# Altium PCB Sampler.PCBDOC (part 6 of 11)
Units mm, origin at the board's own origin, x right, y up, seen from the top; angles counter-clockwise.
Board outline 222.9 x 100 mm, 4 copper layers (L1, P2, L3, L4), stack 1.6 mm thick; 754 components, 442 nets, 2347 pads, 1230 vias.
Unrouted connection lines stored in the file: 10.
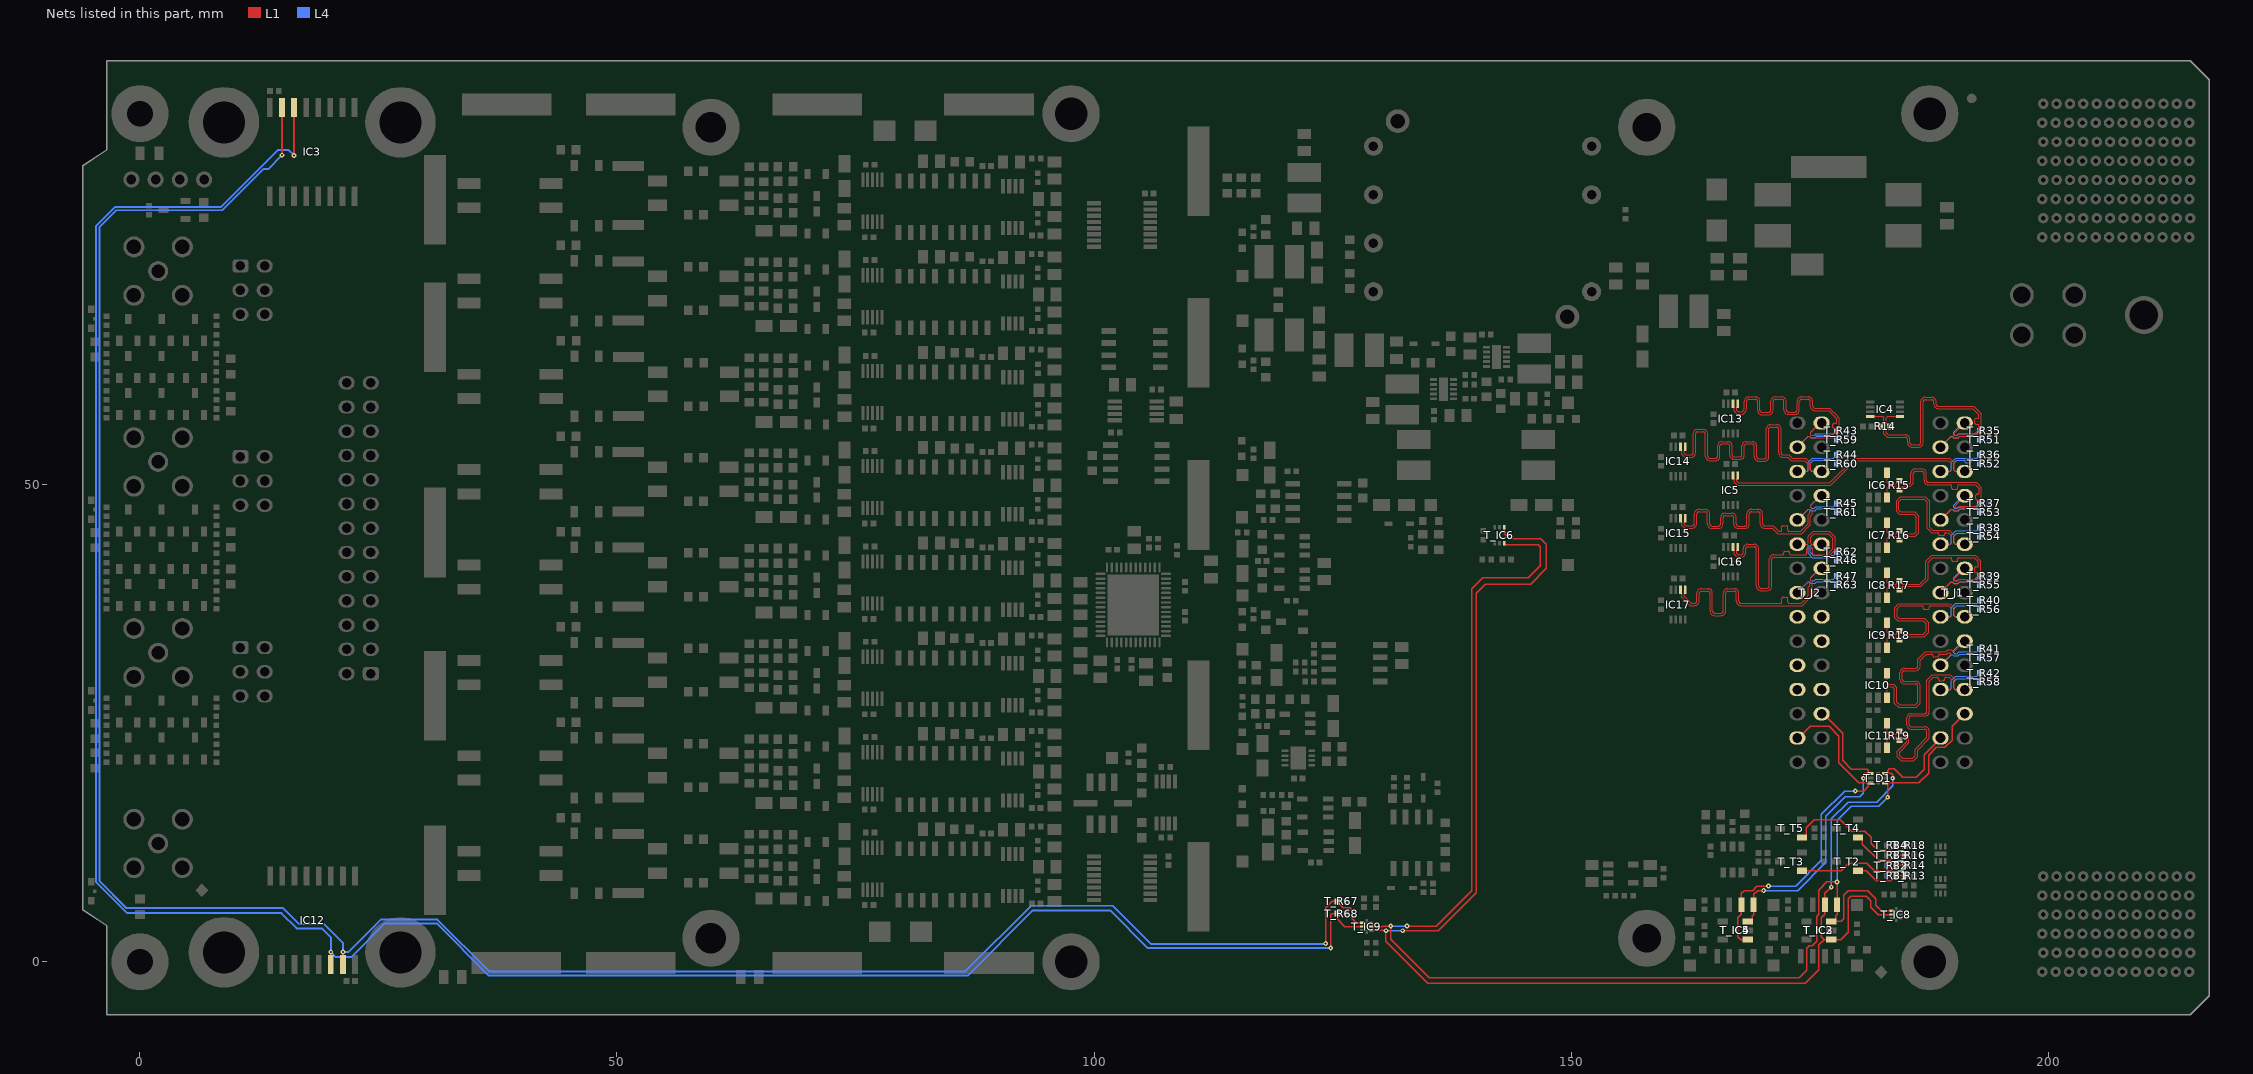
[diagram p7: the nets of this part, all layers, seen from the top]

## Via types
v1: diameter 0.5, hole 0.2, L1 to L4, tented both sides, 1208 vias
v2: diameter 1, hole 0.6, L1 to L4, tented both sides, 16 vias
v3: diameter 0.6, hole 0.3, L1 to L4, tented both sides, 6 vias

## Nets (pads, with @x,y where several pads share a name; then routed paths per layer and width w, separated by ;. In a path a pad name is that pad's centre, name@x,y a point inside that pad or via, vN(x,y) a via of type N, cw(c..) or ccw(c..) an arc to the next point about the centre after c; other vN are vias at no path point) (continued)
EEM0_I2C.SCL: T_D1.3 T_IC2.1 T_IC3.6 T_IC6.1 T_IC8.3 T_IC9.6 T_J1.27 | length 157
  L1 w0.152: T_IC9.6@129.075,3.3 130.563,3.3 v1(130.6,3.263) 130.6,2.17 134.995,-2.225 174.575,-2.225 175.975,-0.825 175.975,1.781 176.528,2.334 ; v1(132.352,3.263) 136.063,3.263 140.058,7.258 140.058,38.648 141.01,39.6 145.769,39.6 147.429,41.259 147.429,43.766 146.827,44.367 143.483,44.367 143,44.85 T_IC6.1@143,45.538 ; v1(177.275,7.825) 177.271,7.825 176.618,7.172 T_IC3.6@176.618,5.984 176.618,4.964 176.255,4.601 176.255,2.608 176.528,2.334 ; T_D1.3@182.937,19.75 T_D1.3@183.175,19.75 ; T_IC8.3@183.616,4.958 182.21,4.958 181.425,5.743 181.425,6.425 180.961,6.889 179.314,6.889 179.042,6.617 179.042,3.095 178.281,2.334 T_IC2.1@177.283,2.334 176.528,2.334 ; v1(183.714,19.243) 183.714,19.625 183.589,19.75 T_D1.3@183.175,19.75 ; T_J1.27@188.73,23.46 187,21.73 187,20.175 186.175,19.35 184.775,19.35 183.9,20.225 183.375,20.225 183.175,20.025 T_D1.3@183.175,19.75
  L4 w0.152: v1(130.6,3.263) v1(132.352,3.263) ; v1(177.275,7.825) 177.275,14.972 179.055,16.751 182.026,16.751 183.714,18.439 v1(183.714,19.243)
EEM0_I2C.SDA: T_D1.1 T_IC2.3 T_IC3.5 T_IC6.6 T_IC8.2 T_IC9.7 T_J1.26 | length 158.5
  L1 w0.152: T_IC9.7@129.075,3.7 130.225,3.7 130.276,3.75 v1(131.1,3.75) 131.1,2.378 135.153,-1.675 173.9,-1.675 174.71,-0.865 174.71,1.435 174.969,1.694 175.27,1.694 175.75,2.174 175.75,4.75 175.975,4.975 175.975,7.525 176.818,8.368 v1(177.888,8.368) T_IC3.5@177.888,5.984 177.888,4.937 177.757,4.806 177.757,4.458 T_IC2.3@177.533,4.234 ; v1(132.8,3.75) 135.867,3.75 139.575,7.458 139.575,39.084 140.74,40.25 145.5,40.25 146.779,41.529 146.779,43.496 146.558,43.717 143.074,43.717 143,43.791 T_IC6.6@143,43.862 ; T_IC2.3@177.283,4.234 T_IC2.3@177.533,4.234 ; T_D1.1@182.937,18.75 T_D1.1@183.102,18.75 ; v1(183.188,17.25) 183.188,18.663 T_D1.1@183.102,18.75 ; T_IC8.2@183.616,5.358 182.517,5.358 181.925,5.95 181.925,6.632 181.097,7.461 179.081,7.461 178.6,6.979 178.6,4.523 178.311,4.234 T_IC2.3@177.533,4.234 ; T_J1.26@191.27,26 189.94,24.67 189.94,23.215 189.2,22.475 188.288,22.475 187.475,21.662 187.475,19.756 186.469,18.75 T_D1.1@183.102,18.75
  L4 w0.152: v1(131.1,3.75) v1(132.8,3.75) ; v1(177.888,8.368) 177.888,14.838 179.35,16.3 182.238,16.3 v1(183.188,17.25)
EEM0_INT_I2C.SCL: IC3.14 IC12.14 T_IC9.3 T_R68.1 | length 248.9
  L1 w0.152: IC12.14@20.005,-0.3 v1@20.005,1.031 ; v1(124.815,1.441) 124.815,4.972 124.904,5.061 T_R68.1@125.48,5.061 125.48,4.525 126.305,3.7 T_IC9.3@128.125,3.7
  L1 w0.203: v1@16.125,84.5 v1(16.145,84.52) IC3.14@16.145,89.55
  L4 w0.203: v1(16.145,84.52) 15.578,85.087 14.438,85.087 8.463,79.112 -2.621,79.112 -4.594,77.139 -4.594,18.575 -4.594,8.342 -1.351,5.099 14.822,5.099 16.413,3.508 19.047,3.508 20.005,2.55 v1(20.005,1.038) 20.543,0.5 22.141,0.5 25.678,4.036 31.088,4.036 36.564,-1.44 86.745,-1.44 93.572,5.387 101.706,5.387 105.652,1.441 v1(124.815,1.441)
EEM0_INT_I2C.SDA: IC3.15 IC12.15 T_IC9.2 T_R67.1 | length 246.8
  L1 w0.152: IC12.15@21.275,-0.3 v1@21.275,1.031 ; v1(124.285,1.919) 124.285,5.66 124.956,6.331 T_R67.1@125.48,6.331 125.48,6.311 126.116,5.675 126.8,5.675 127.025,5.45 127.025,4.573 127.498,4.1 T_IC9.2@128.125,4.1
  L1 w0.203: v1(14.875,84.55) IC3.15@14.875,89.55
  L4 w0.203: v1(14.875,84.55) 13.425,83.1 12.92,83.1 8.6,78.78 -2.484,78.78 -4.263,77.002 -4.263,18.575 -4.263,8.479 -1.413,5.629 15.013,5.629 16.701,3.941 19.32,3.941 21.275,1.985 v1(21.275,1.038) 21.876,1.038 25.257,4.419 31.174,4.419 36.602,-1.009 86.52,-1.009 93.407,5.879 101.963,5.879 105.953,1.888 124.254,1.888 v1(124.285,1.919)
EEM1_I2C.SCL: T_D1.6 T_IC4.1 T_IC5.6 T_J2.27 | length 39.3
  L1 w0.152: T_IC4.1@168.528,2.334 167.773,2.334 167.499,2.608 167.499,4.601 167.863,4.964 T_IC5.6@167.863,5.984 167.863,7.172 168.165,7.475 169.025,7.475 169.493,7.943 v1(170.691,7.943) ; T_J2.27@173.73,23.46 173.88,23.46 175.095,24.675 177.051,24.675 178.057,23.669 178.057,20.872 180.179,18.75 T_D1.6@181.252,18.75 ; v1(179.79,17.9) 180.675,17.9 181.165,18.39 181.165,18.663 T_D1.6@181.252,18.75 ; T_D1.6@181.417,18.75 T_D1.6@181.252,18.75
  L4 w0.152: v1(170.691,7.943) 173.543,7.943 176.223,10.623 176.223,15.442 178.681,17.9 v1(179.79,17.9)
EEM1_I2C.SDA: T_D1.4 T_IC4.3 T_IC5.5 T_J2.26 | length 34.1
  L1 w0.152: T_IC4.3@168.528,4.234 168.778,4.234 169.001,4.458 169.001,4.806 169.133,4.937 T_IC5.5@169.133,5.984 169.133,7.058 169.547,7.472 v1(170.195,7.472) ; T_J2.26@176.27,26 176.42,26 178.475,23.945 178.475,21.124 179.399,20.2 181.05,20.2 181.178,20.072 T_D1.4@181.178,19.75 ; v1(180.639,19.243) 180.639,19.625 180.764,19.75 T_D1.4@181.178,19.75 ; T_D1.4@181.417,19.75 T_D1.4@181.178,19.75
  L4 w0.152: v1(170.195,7.472) 173.747,7.472 176.7,10.425 176.7,15.244 178.756,17.3 180.275,17.3 180.639,17.664 v1(180.639,19.243)
EEM_IO.LVDS_N0: IC4.1 R14.1 T_J1.3 T_R51.2 | length 31.5
  L1 w0.127: R14.1@183.387,56.114 183.044,55.771 183.044,55.438 183.251,55.231 183.476,55.231 185.048,55.231 cw(c185.048,54.752) 185.527,54.752 185.527,54.423 ccw(c185.753,54.423) 185.753,54.198 186.429,54.198 ccw(c186.429,54.423) 186.654,54.423 186.654,58.696 cw(c187.134,58.696) 187.134,59.176 187.81,59.176 cw(c187.81,58.696) 188.289,58.696 188.289,58.458 ccw(c188.515,58.458) 188.515,58.233 188.966,58.233 189.104,58.233 192.221,58.233 193.012,57.442 193.012,55.726 192.376,55.09 192.279,55.09 192.276,55.087 190.746,55.087 190.528,54.869 190.128,54.869 189.978,55.019 189.809,55.019 T_J1.3@188.73,53.94 ; R14.1@183.387,56.134 183.161,56.36 183.119,56.36 183.044,56.435 183.044,57.026 183.183,57.164 IC4.1@184.467,57.164
  L4 w0.127: T_J1.3@188.73,53.94 189.858,55.068 189.963,55.068 190.112,54.919 190.6,54.919 190.771,55.09 192.535,55.09 192.856,54.769 T_R51.2@192.856,54.749
EEM_IO.LVDS_N1: IC5.5 T_J1.6 T_R52.2 | length 32
  L1 w0.127: IC5.5@167.478,50.994 167.478,50.719 167.355,50.596 167.355,50.384 167.52,50.219 177.138,50.219 179.721,52.801 189.699,52.801 190.152,52.347 190.152,51.52 190.272,51.4 T_J1.6@191.27,51.4
  L4 w0.127: T_J1.6@191.27,51.4 190.287,51.4 190.102,51.586 190.102,52.242 190.41,52.55 190.498,52.55 191.189,52.55 cw(c191.189,52.423) 191.316,52.423 191.316,52.416 ccw(c191.441,52.416) 191.441,52.291 191.817,52.291 ccw(c191.817,52.416) 191.943,52.416 191.943,52.423 cw(c192.07,52.423) 192.07,52.55 192.535,52.55 192.566,52.519 192.856,52.229 T_R52.2@192.856,52.209
EEM_IO.LVDS_N2: IC6.4 R15.1 T_J1.9 T_R53.2 | length 25.4
  L1 w0.127: IC6.4@183.127,51.27 183.127,50.274 183.303,50.098 184.065,50.098 184.407,50.44 R15.1@184.427,50.44 184.447,50.44 184.788,50.098 185.207,50.098 185.398,50.098 ccw(c185.398,50.323) 185.623,50.323 185.623,51.178 cw(c186.102,51.178) 186.102,51.657 186.779,51.657 cw(c186.779,51.178) 187.258,51.178 187.258,50.468 ccw(c187.483,50.468) 187.483,50.243 188.085,50.243 192.486,50.243 193.025,49.705 193.025,49.49 193.025,47.992 192.53,47.497 192.428,47.497 192.427,47.496 190.849,47.496 190.632,47.279 190.223,47.279 190.073,47.429 189.904,47.429 T_J1.9@188.825,46.35
  L4 w0.127: T_J1.9@188.73,46.32 189.858,47.448 189.963,47.448 190.112,47.299 190.6,47.299 190.771,47.47 192.535,47.47 192.856,47.149 T_R53.2@192.856,47.129
EEM_IO.LVDS_N3: IC7.4 R16.1 T_J1.12 T_R54.2 | length 25.9
  L1 w0.127: IC7.4@183.127,46.02 183.127,45.024 183.303,44.848 184.065,44.848 184.407,45.19 R16.1@184.427,45.19 184.447,45.19 184.788,44.848 185.954,44.848 186.2,45.094 186.2,46.599 185.903,46.896 184.445,46.896 184.37,46.97 184.121,47.22 184.121,48.33 184.52,48.729 187.155,48.729 187.23,48.655 187.589,48.295 187.589,45.543 187.885,45.247 189.633,45.247 189.713,45.167 190.152,44.727 190.152,43.9 190.272,43.78 T_J1.12@191.27,43.78
  L4 w0.127: T_J1.12@191.27,43.78 190.287,43.78 190.102,43.966 190.102,44.622 190.41,44.93 192.535,44.93 192.856,44.609 T_R54.2@192.856,44.589
EEM_IO.LVDS_N4: IC8.4 R17.1 T_J1.15 T_R55.2 | length 25.3
  L1 w0.127: IC8.4@183.127,40.77 183.127,39.774 183.303,39.598 184.065,39.598 184.407,39.94 R17.1@184.427,39.94 184.447,39.94 184.788,39.598 186.543,39.598 187.173,40.228 187.173,41.978 187.805,42.609 192.359,42.609 192.962,42.006 192.962,40.382 192.416,39.836 190.744,39.836 190.537,39.629 190.128,39.629 189.978,39.779 189.809,39.779 T_J1.15@188.73,38.7
  L4 w0.127: T_J1.15@188.73,38.7 189.858,39.828 189.963,39.828 190.112,39.679 190.6,39.679 190.771,39.85 192.535,39.85 192.856,39.529 T_R55.2@192.856,39.509
EEM_IO.LVDS_N5: IC9.4 R18.1 T_J1.18 T_R56.2 | length 24.5
  L1 w0.127: IC9.4@183.127,35.52 183.127,34.524 183.303,34.348 184.065,34.348 184.407,34.69 184.447,34.69 184.788,34.348 186.916,34.348 187.225,34.657 187.225,35.458 186.937,35.746 184.231,35.746 183.92,36.056 183.92,37.134 184.069,37.283 184.193,37.407 184.342,37.555 186.115,37.555 189.704,37.555 189.801,37.459 190.152,37.107 190.152,36.28 190.272,36.16 T_J1.18@191.27,36.16
  L4 w0.127: T_J1.18@191.27,36.16 190.287,36.16 190.102,36.346 190.102,37.002 190.41,37.31 192.535,37.31 192.856,36.989 T_R56.2@192.856,36.969
EEM_IO.LVDS_N6: IC10.3 T_J1.21 T_R57.2 | length 24.6
  L1 w0.127: IC10.3@183.127,27.67 183.127,28.617 183.325,28.816 183.7,28.816 183.9,28.616 183.9,27.12 184.34,26.68 186.165,26.68 186.605,27.119 186.605,28.725 186.605,28.916 ccw(c186.125,28.916) 186.125,29.395 184.952,29.395 cw(c184.952,29.62) 184.727,29.62 184.727,30.297 cw(c184.952,30.297) 184.952,30.522 186.125,30.522 ccw(c186.125,31.001) 186.605,31.001 186.605,31.591 186.605,31.606 187.149,32.151 187.255,32.256 187.776,32.256 cw(c187.776,32.129) 187.903,32.129 187.903,32.096 ccw(c188.028,32.096) 188.028,31.971 188.404,31.971 ccw(c188.404,32.096) 188.53,32.096 188.53,32.129 cw(c188.657,32.129) 188.657,32.256 189.02,32.256 189.387,32.256 189.522,32.391 189.708,32.391 189.822,32.277 189.822,32.172 T_J1.21@188.73,31.08
  L4 w0.127: T_J1.21@188.73,31.08 189.858,32.208 189.963,32.208 190.112,32.059 190.6,32.059 190.771,32.23 192.535,32.23 192.856,31.909 T_R57.2@192.856,31.889
EEM_IO.LVDS_N7: IC11.4 R19.1 T_J1.24 T_R58.2 | length 30.4
  L1 w0.127: IC11.4@183.127,25.02 183.127,24.024 183.303,23.848 184.065,23.848 184.407,24.19 R19.1@184.427,24.19 184.447,24.19 184.79,23.847 185.143,23.847 185.424,23.566 185.424,22.958 184.45,21.984 184.45,21.583 184.708,21.325 185.821,21.325 186.096,21.6 186.096,22.302 186.245,22.45 187.31,23.516 187.31,23.973 187.31,24.163 ccw(c187.085,24.163) 187.085,24.389 185.661,24.389 cw(c185.661,24.868) 185.181,24.868 185.181,25.544 cw(c185.661,25.544) 185.661,26.024 187.085,26.024 ccw(c187.085,26.249) 187.31,26.249 187.31,26.8 187.31,29.5 187.459,29.649 187.729,29.919 187.878,30.068 189.74,30.068 189.889,29.919 190.004,29.804 190.152,29.655 190.152,28.66 190.272,28.54 T_J1.24@191.27,28.54
  L4 w0.127: T_J1.24@191.27,28.54 190.287,28.54 190.102,28.726 190.102,29.382 190.41,29.69 192.535,29.69 192.856,29.369 T_R58.2@192.856,29.349
EEM_IO.LVDS_N8: IC13.5 T_J2.3 T_R59.2 | length 30.8
  L1 w0.127: IC13.5@167.478,58.494 167.478,58.219 167.355,58.096 167.355,57.829 167.547,57.637 167.929,57.637 168.029,57.737 ; 168.029,57.737 ccw(c167.694,58.073) 168.169,58.073 168.169,58.735 cw(c168.648,58.735) 168.648,59.215 169.324,59.215 cw(c169.324,58.735) 169.804,58.735 169.804,57.821 ccw(c170.029,57.821) 170.029,57.595 170.705,57.595 ccw(c170.705,57.821) 170.931,57.821 170.931,58.735 cw(c171.41,58.735) 171.41,59.215 172.086,59.215 cw(c172.086,58.735) 172.566,58.735 172.566,57.85 ccw(c172.791,57.85) 172.791,57.624 173.467,57.624 ccw(c173.467,57.85) 173.693,57.85 173.693,58.735 cw(c174.172,58.735) 174.172,59.215 174.848,59.215 cw(c174.848,58.735) 175.328,58.735 175.328,58.264 ccw(c175.553,58.264) 175.553,58.039 176.152,58.039 177.102,58.039 177.251,57.89 177.742,57.398 178.035,57.105 178.11,57.031 178.11,55.564 177.961,55.415 177.613,55.067 177.464,54.919 175.111,54.919 174.963,55.067 174.857,55.067 T_J2.3@173.73,53.94
  L4 w0.127: T_J2.3@173.73,53.94 174.857,55.067 174.963,55.067 175.111,54.919 175.599,54.919 175.771,55.09 177.534,55.09 177.856,54.769 T_R59.2@177.856,54.749
EEM_IO.LVDS_N9: IC14.5 T_J2.6 T_R60.2 | length 38.2
  L1 w0.127: IC14.5@161.978,53.994 161.978,53.719 161.855,53.596 161.855,53.329 162.047,53.137 162.401,53.137 162.591,53.137 ccw(c162.591,53.342) 162.797,53.342 162.797,55.34 cw(c163.256,55.34) 163.256,55.8 163.872,55.8 cw(c163.872,55.34) 164.332,55.34 164.332,52.994 ccw(c164.537,52.994) 164.537,52.789 165.153,52.789 ccw(c165.153,52.994) 165.359,52.994 165.359,54.074 cw(c165.818,54.074) 165.818,54.533 166.434,54.533 cw(c166.434,54.074) 166.894,54.074 166.894,53.129 ccw(c167.099,53.129) 167.099,52.924 167.715,52.924 ccw(c167.715,53.129) 167.921,53.129 167.921,54.074 cw(c168.38,54.074) 168.38,54.533 168.996,54.533 cw(c168.996,54.074) 169.456,54.074 169.456,52.943 ccw(c169.661,52.943) 169.661,52.737 170.277,52.737 ccw(c170.277,52.943) 170.483,52.943 170.483,55.85 cw(c170.942,55.85) 170.942,56.31 171.558,56.31 cw(c171.558,55.85) 172.018,55.85 172.018,53.342 ccw(c172.223,53.342) 172.223,53.137 172.823,53.137 173.19,52.769 173.548,52.769 174.628,52.769 175.127,52.27 175.127,51.474 175.201,51.4 T_J2.6@176.27,51.4
  L4 w0.127: T_J2.6@176.27,51.4 175.287,51.4 175.101,51.585 175.101,52.242 175.41,52.55 177.534,52.55 177.856,52.229 T_R60.2@177.856,52.209
EEM_IO.LVDS_N10: IC15.5 T_J2.9 T_R61.2 | length 31.2
  L1 w0.127: IC15.5@161.977,46.494 161.977,46.219 161.854,46.096 161.854,45.873 162.016,45.711 162.5,45.711 162.691,45.711 ccw(c162.691,45.936) 162.916,45.936 162.916,46.938 cw(c163.395,46.938) 163.395,47.418 164.072,47.418 cw(c164.072,46.938) 164.551,46.938 164.551,45.901 ccw(c164.776,45.901) 164.776,45.676 165.453,45.676 ccw(c165.453,45.901) 165.678,45.901 165.678,46.554 cw(c166.157,46.554) 166.157,47.034 166.834,47.034 cw(c166.834,46.554) 167.313,46.554 167.313,45.901 ccw(c167.538,45.901) 167.538,45.676 168.215,45.676 ccw(c168.215,45.901) 168.44,45.901 168.44,46.938 cw(c168.919,46.938) 168.919,47.418 169.596,47.418 cw(c169.596,46.938) 170.075,46.938 170.075,45.936 ccw(c170.3,45.936) 170.3,45.711 171.02,45.711 171.181,45.711 171.749,45.143 171.901,45.143 171.964,45.143 ccw(c171.964,45.27) 172.091,45.27 172.091,45.59 cw(c172.216,45.59) 172.216,45.716 172.593,45.716 cw(c172.593,45.59) 172.718,45.59 172.718,45.27 ccw(c172.845,45.27) 172.845,45.143 173.378,45.143 174.066,45.143 174.845,45.922 174.845,46.835 175.037,47.027 175.037,47.373 174.963,47.447 174.857,47.447 T_J2.9@173.73,46.32
  L4 w0.127: T_J2.9@173.73,46.32 174.857,47.447 174.963,47.447 175.111,47.299 175.599,47.299 175.771,47.47 177.534,47.47 177.856,47.149 T_R61.2@177.856,47.129
EEM_IO.LVDS_N11: IC16.5 T_J2.12 T_R62.2 | length 31.7
  L1 w0.127: IC16.5@167.478,43.495 167.478,43.22 167.355,43.097 167.355,42.83 167.517,42.668 167.624,42.668 167.815,42.668 ccw(c167.815,42.893) 168.04,42.893 168.04,43.289 cw(c168.519,43.289) 168.519,43.768 169.196,43.768 cw(c169.196,43.289) 169.675,43.289 169.675,39.397 ccw(c169.9,39.397) 169.9,39.172 170.577,39.172 ccw(c170.577,39.397) 170.802,39.397 170.802,42.188 cw(c171.281,42.188) 171.281,42.668 171.897,42.668 172.088,42.668 172.151,42.668 ccw(c172.151,42.795) 172.278,42.795 172.278,42.891 cw(c172.404,42.891) 172.404,43.016 172.78,43.016 cw(c172.78,42.891) 172.905,42.891 172.905,42.795 ccw(c173.032,42.795) 173.032,42.668 173.344,42.668 174.503,42.668 174.567,42.668 ccw(c174.567,42.795) 174.694,42.795 174.694,43.258 cw(c174.819,43.258) 174.819,43.383 175.195,43.383 cw(c175.195,43.258) 175.321,43.258 175.321,42.795 ccw(c175.448,42.795) 175.448,42.668 175.971,42.668 176.854,42.668 177.459,43.272 177.459,44.377 176.95,44.886 175.485,44.886 175.127,44.528 175.127,43.854 175.201,43.78 T_J2.12@176.27,43.78
  L4 w0.127: T_J2.12@176.27,43.78 175.287,43.78 175.101,43.594 175.101,42.938 175.41,42.629 177.534,42.629 177.856,42.951 T_R62.2@177.856,42.971
EEM_IO.LVDS_N12: IC17.5 T_J2.15 T_R63.2 | length 30.5
  L1 w0.127: IC17.5@161.977,38.995 161.977,38.72 161.854,38.597 161.854,38.33 162.586,37.597 162.777,37.597 162.968,37.597 ccw(c162.968,37.823) 163.193,37.823 163.193,38.64 cw(c163.673,38.64) 163.673,39.12 164.349,39.12 cw(c164.349,38.64) 164.828,38.64 164.828,36.775 ccw(c165.054,36.775) 165.054,36.549 165.73,36.549 ccw(c165.73,36.775) 165.955,36.775 165.955,38.64 cw(c166.435,38.64) 166.435,39.12 167.111,39.12 cw(c167.111,38.64) 167.59,38.64 167.59,37.823 ccw(c167.816,37.823) 167.816,37.597 168.432,37.597 171.908,37.597 171.972,37.597 ccw(c171.972,37.724) 172.099,37.724 172.099,38.078 cw(c172.224,38.078) 172.224,38.203 172.6,38.203 cw(c172.6,38.078) 172.726,38.078 172.726,37.724 ccw(c172.853,37.724) 172.853,37.597 173.085,37.597 174.124,37.597 174.879,38.352 174.879,39.239 175.037,39.397 175.037,39.753 174.963,39.827 174.857,39.827 T_J2.15@173.73,38.7
  L4 w0.127: T_J2.15@173.73,38.7 174.857,39.827 174.963,39.827 175.111,39.679 175.599,39.679 175.771,39.85 177.534,39.85 177.856,39.529 T_R63.2@177.856,39.509
EEM_IO.LVDS_N13: T_J2.18
EEM_IO.LVDS_N14: T_J2.21
EEM_IO.LVDS_N15: T_J2.24
EEM_IO.LVDS_P0: IC4.8 R14.2 T_J1.2 T_R35.2 | length 31.4
  L1 w0.127: IC4.8@181.367,57.164 182.657,57.164 182.79,57.03 182.79,56.435 182.716,56.36 182.674,56.36 R14.2@182.447,56.134 ; R14.2@182.447,56.114 182.79,55.771 182.79,55.332 183.146,54.977 183.476,54.977 185.048,54.977 cw(c185.048,54.752) 185.273,54.752 185.273,54.423 ccw(c185.753,54.423) 185.753,53.944 186.429,53.944 ccw(c186.429,54.423) 186.908,54.423 186.908,58.696 cw(c187.134,58.696) 187.134,58.922 187.81,58.922 cw(c187.81,58.696) 188.035,58.696 188.035,58.458 ccw(c188.515,58.458) 188.515,57.979 188.966,57.979 189.104,57.979 192.115,57.979 192.443,57.65 192.758,57.336 192.758,57.054 192.664,56.96 192.412,56.96 192.318,56.866 192.318,56.427 192.412,56.333 192.664,56.333 192.758,56.239 192.758,55.831 192.458,55.532 192.271,55.344 190.628,55.344 190.453,55.169 190.292,55.169 190.178,55.283 190.178,55.388 T_J1.2@191.27,56.48
  L4 w0.127: T_J1.2@191.27,56.48 191.12,56.48 190.142,55.502 190.142,55.247 190.217,55.173 190.495,55.173 190.666,55.344 192.532,55.344 192.61,55.422 192.63,55.422 192.856,55.648 T_R35.2@192.856,55.668
EEM_IO.LVDS_P1: IC5.6 T_J1.5 T_R36.2 | length 32.1
  L1 w0.127: IC5.6@166.978,50.994 166.978,50.719 167.101,50.596 167.101,50.279 167.415,49.965 177.244,49.965 179.815,52.536 189.605,52.536 189.898,52.242 189.898,51.586 189.713,51.4 T_J1.5@188.73,51.4
  L4 w0.127: T_J1.5@188.73,51.4 189.728,51.4 189.848,51.52 189.848,52.347 190.305,52.804 192.532,52.804 192.609,52.882 192.629,52.882 192.856,53.108 T_R36.2@192.856,53.128
EEM_IO.LVDS_P2: IC6.3 R15.2 T_J1.8 T_R37.2 | length 25.3
  L1 w0.127: IC6.3@183.127,48.67 183.127,49.637 183.333,49.844 184.062,49.844 184.407,49.5 R15.2@184.427,49.5 184.447,49.5 184.791,49.844 185.207,49.844 185.398,49.844 ccw(c185.398,50.323) 185.877,50.323 185.877,51.178 cw(c186.102,51.178) 186.102,51.403 186.779,51.403 cw(c186.779,51.178) 187.004,51.178 187.004,50.468 ccw(c187.483,50.468) 187.483,49.989 188.085,49.989 189.084,49.989 189.774,49.989 cw(c189.774,49.862) 189.901,49.862 189.901,49.653 ccw(c190.027,49.653) 190.027,49.528 190.403,49.528 ccw(c190.403,49.653) 190.528,49.653 190.528,49.862 cw(c190.655,49.862) 190.655,49.989 191.2,49.989 192.381,49.989 192.583,49.788 192.771,49.6 192.771,49.161 cw(c192.644,49.161) 192.644,49.034 192.573,49.034 ccw(c192.573,48.909) 192.447,48.909 192.447,48.533 ccw(c192.573,48.533) 192.573,48.407 192.644,48.407 cw(c192.644,48.28) 192.771,48.28 192.771,48.097 192.669,47.995 192.425,47.751 190.729,47.751 190.557,47.579 190.387,47.579 190.273,47.693 190.273,47.798 T_J1.8@191.365,48.89
  L4 w0.127: T_J1.8@191.27,48.86 191.12,48.86 190.142,47.882 190.142,47.627 190.217,47.553 190.495,47.553 190.666,47.724 192.532,47.724 192.61,47.802 192.63,47.802 192.856,48.028 T_R37.2@192.856,48.048
EEM_IO.LVDS_P3: IC7.3 R16.2 T_J1.11 T_R38.2 | length 26.2
  L1 w0.127: IC7.3@183.127,43.42 183.127,44.387 183.333,44.594 184.062,44.594 184.407,44.25 R16.2@184.427,44.25 184.447,44.25 184.791,44.594 186.059,44.594 186.454,44.989 186.454,46.705 186.009,47.15 184.55,47.15 184.375,47.325 184.375,48.225 184.625,48.475 187.05,48.475 187.335,48.19 187.335,45.438 187.589,45.184 187.78,44.993 188.406,44.993 cw(c188.406,44.866) 188.533,44.866 188.533,44.818 ccw(c188.659,44.818) 188.659,44.693 189.035,44.693 ccw(c189.035,44.818) 189.16,44.818 189.16,44.866 cw(c189.287,44.866) 189.287,44.993 189.528,44.993 189.581,44.94 189.898,44.622 189.898,43.966 189.713,43.78 T_J1.11@188.73,43.78
  L4 w0.127: T_J1.11@188.73,43.78 189.728,43.78 189.848,43.9 189.848,44.727 190.305,45.184 192.532,45.184 192.609,45.262 192.629,45.262 192.856,45.488 T_R38.2@192.856,45.508
EEM_IO.LVDS_P4: IC8.3 R17.2 T_J1.14 T_R39.2 | length 25.1
  L1 w0.127: IC8.3@183.127,38.17 183.127,39.137 183.333,39.344 184.062,39.344 184.407,39 R17.2@184.427,39 184.447,39 184.791,39.344 186.649,39.344 187.427,40.122 187.427,41.872 187.91,42.355 189.093,42.355 189.784,42.355 cw(c189.784,42.228) 189.911,42.228 189.911,42.115 ccw(c190.036,42.115) 190.036,41.99 190.412,41.99 ccw(c190.412,42.115) 190.538,42.115 190.538,42.228 cw(c190.665,42.228) 190.665,42.355 190.941,42.355 192.254,42.355 192.461,42.148 192.708,41.901 192.708,41.521 cw(c192.581,41.521) 192.581,41.394 192.436,41.394 ccw(c192.436,41.269) 192.311,41.269 192.311,40.893 ccw(c192.436,40.893) 192.436,40.767 192.581,40.767 cw(c192.581,40.64) 192.708,40.64 192.708,40.487 192.564,40.344 192.321,40.101 190.634,40.101 190.462,39.929 190.292,39.929 190.178,40.043 190.178,40.148 T_J1.14@191.27,41.24
  L4 w0.127: T_J1.14@191.27,41.24 191.12,41.24 190.142,40.262 190.142,40.007 190.217,39.933 190.495,39.933 190.666,40.104 192.532,40.104 192.61,40.182 192.63,40.182 192.856,40.408 T_R39.2@192.856,40.428
EEM_IO.LVDS_P5: IC9.3 R18.2 T_J1.17 T_R40.2 | length 25
  L1 w0.127: IC9.3@183.127,32.92 183.127,33.887 183.333,34.094 184.062,34.094 184.407,33.75 184.447,33.75 184.791,34.094 187.021,34.094 187.479,34.552 187.479,35.564 187.043,36 184.336,36 184.174,36.162 184.174,37.029 184.447,37.301 186.115,37.301 186.805,37.301 cw(c186.805,37.174) 186.932,37.174 186.932,37.067 ccw(c187.058,37.067) 187.058,36.942 187.434,36.942 ccw(c187.434,37.067) 187.559,37.067 187.559,37.174 cw(c187.686,37.174) 187.686,37.301 188.178,37.301 189.599,37.301 189.898,37.002 189.898,36.346 189.713,36.16 T_J1.17@188.73,36.16
  L4 w0.127: T_J1.17@188.73,36.16 189.728,36.16 189.848,36.28 189.848,37.107 190.305,37.564 192.532,37.564 192.609,37.642 192.629,37.642 192.856,37.868 T_R40.2@192.856,37.888
EEM_IO.LVDS_P6: IC10.4 T_J1.20 T_R41.2 | length 24.4
  L1 w0.127: IC10.4@183.127,30.27 183.127,29.322 183.379,29.07 183.805,29.07 184.154,28.721 184.154,27.225 184.445,26.934 186.06,26.934 186.351,27.225 186.351,28.725 186.351,28.916 ccw(c186.125,28.916) 186.125,29.141 184.952,29.141 cw(c184.952,29.62) 184.473,29.62 184.473,30.297 cw(c184.952,30.297) 184.952,30.776 186.125,30.776 ccw(c186.125,31.001) 186.351,31.001 186.351,31.591 186.351,31.711 187.149,32.51 189.282,32.51 189.463,32.691 189.872,32.691 190.022,32.541 190.191,32.541 T_J1.20@191.27,33.62
  L4 w0.127: T_J1.20@191.27,33.62 191.12,33.62 190.142,32.642 190.142,32.387 190.217,32.313 190.495,32.313 190.666,32.484 192.532,32.484 192.61,32.562 192.63,32.562 192.856,32.788 T_R41.2@192.856,32.808
EEM_IO.LVDS_P7: IC11.3 R19.2 T_J1.23 T_R42.2 | length 30.9
  L1 w0.127: IC11.3@183.127,22.42 183.127,23.387 183.333,23.594 184.062,23.594 184.407,23.25 R19.2@184.427,23.25 184.447,23.25 184.79,23.593 185.038,23.593 185.17,23.461 ; 185.17,23.461 185.17,23.063 184.196,22.089 184.196,21.478 184.603,21.071 185.926,21.071 186.35,21.495 186.35,22.196 187.564,23.411 187.564,23.973 187.564,24.163 ccw(c187.085,24.163) 187.085,24.643 185.661,24.643 cw(c185.661,24.868) 185.435,24.868 185.435,25.544 cw(c185.661,25.544) 185.661,25.77 187.085,25.77 ccw(c187.085,26.249) 187.564,26.249 187.564,26.8 187.564,29.395 187.779,29.61 187.983,29.814 188.405,29.814 cw(c188.405,29.687) 188.532,29.687 188.532,29.606 ccw(c188.658,29.606) 188.658,29.481 189.034,29.481 ccw(c189.034,29.606) 189.159,29.606 189.159,29.687 cw(c189.286,29.687) 189.286,29.814 189.635,29.814 189.89,29.558 189.898,29.55 189.898,28.726 189.713,28.54 T_J1.23@188.73,28.54
  L4 w0.127: T_J1.23@188.73,28.54 189.728,28.54 189.848,28.66 189.848,29.487 190.305,29.944 192.532,29.944 192.609,30.022 192.629,30.022 192.856,30.248 T_R42.2@192.856,30.268
EEM_IO.LVDS_P8: IC13.6 T_J2.2 T_R43.2 | length 30.7
  L1 w0.127: IC13.6@166.978,58.494 166.978,58.219 167.101,58.096 167.101,57.724 167.442,57.383 167.929,57.383 168.035,57.383 168.209,57.557 ccw(c167.694,58.073) 168.423,58.073 168.423,58.735 cw(c168.648,58.735) 168.648,58.961 169.324,58.961 cw(c169.324,58.735) 169.55,58.735 169.55,57.821 ccw(c170.029,57.821) 170.029,57.341 170.705,57.341 ccw(c170.705,57.821) 171.185,57.821 171.185,58.735 cw(c171.41,58.735) 171.41,58.961 172.086,58.961 cw(c172.086,58.735) 172.312,58.735 172.312,57.85 ccw(c172.791,57.85) 172.791,57.37 173.467,57.37 ccw(c173.467,57.85) 173.947,57.85 173.947,58.735 cw(c174.172,58.735) 174.172,58.961 174.848,58.961 cw(c174.848,58.735) 175.074,58.735 175.074,58.264 ccw(c175.553,58.264) 175.553,57.785 176.152,57.785 176.997,57.785 177.694,57.088 177.856,56.926 177.856,56.572 cw(c177.729,56.572) 177.729,56.445 177.566,56.445 ccw(c177.566,56.339) 177.461,56.339 177.461,56.023 ccw(c177.566,56.023) 177.566,55.918 177.729,55.918 cw(c177.729,55.791) 177.856,55.791 177.856,55.669 177.416,55.229 177.359,55.173 175.217,55.173 175.142,55.247 175.142,55.502 176.12,56.48 T_J2.2@176.27,56.48
  L4 w0.127: T_J2.2@176.27,56.48 176.12,56.48 175.142,55.502 175.142,55.247 175.217,55.173 175.494,55.173 175.666,55.344 177.532,55.344 177.609,55.422 177.629,55.422 177.856,55.648 T_R43.2@177.856,55.668
EEM_IO.LVDS_P9: IC14.6 T_J2.5 T_R44.2 | length 38.6
  L1 w0.127: IC14.6@161.478,53.994 161.478,53.719 161.601,53.596 161.601,53.224 161.942,52.883 162.401,52.883 162.591,52.883 ccw(c162.591,53.342) 163.051,53.342 163.051,55.34 cw(c163.256,55.34) 163.256,55.546 163.872,55.546 cw(c163.872,55.34) 164.078,55.34 164.078,52.994 ccw(c164.537,52.994) 164.537,52.535 165.153,52.535 ccw(c165.153,52.994) 165.613,52.994 165.613,54.074 cw(c165.818,54.074) 165.818,54.279 166.434,54.279 cw(c166.434,54.074) 166.64,54.074 166.64,53.129 ccw(c167.099,53.129) 167.099,52.67 167.715,52.67 ccw(c167.715,53.129) 168.175,53.129 168.175,54.074 cw(c168.38,54.074) 168.38,54.279 168.996,54.279 cw(c168.996,54.074) 169.202,54.074 169.202,52.943 ccw(c169.661,52.943) 169.661,52.483 170.277,52.483 ccw(c170.277,52.943) 170.737,52.943 170.737,55.85 cw(c170.942,55.85) 170.942,56.056 171.558,56.056 cw(c171.558,55.85) 171.764,55.85 171.764,53.342 ccw(c172.223,53.342) 172.223,52.883 172.718,52.883 173.085,52.515 173.548,52.515 174.522,52.515 174.873,52.165 174.873,51.474 174.798,51.4 T_J2.5@173.73,51.4
  L4 w0.127: T_J2.5@173.73,51.4 174.728,51.4 174.847,51.519 174.847,52.347 175.304,52.804 177.532,52.804 177.609,52.882 177.629,52.882 177.856,53.108 T_R44.2@177.856,53.128
EEM_IO.LVDS_P10: IC15.6 T_J2.8 T_R45.2 | length 31.3
  L1 w0.127: IC15.6@161.477,46.494 161.477,46.219 161.6,46.096 161.6,45.767 161.911,45.457 162.5,45.457 162.691,45.457 ccw(c162.691,45.936) 163.17,45.936 163.17,46.938 cw(c163.395,46.938) 163.395,47.164 164.072,47.164 cw(c164.072,46.938) 164.297,46.938 164.297,45.901 ccw(c164.776,45.901) 164.776,45.422 165.453,45.422 ccw(c165.453,45.901) 165.932,45.901 165.932,46.554 cw(c166.157,46.554) 166.157,46.78 166.834,46.78 cw(c166.834,46.554) 167.059,46.554 167.059,45.901 ccw(c167.538,45.901) 167.538,45.422 168.215,45.422 ccw(c168.215,45.901) 168.694,45.901 168.694,46.938 cw(c168.919,46.938) 168.919,47.164 169.596,47.164 cw(c169.596,46.938) 169.821,46.938 169.821,45.936 ccw(c170.3,45.936) 170.3,45.457 171.02,45.457 171.076,45.457 171.644,44.889 174.171,44.889 175.099,45.817 175.099,46.73 175.291,46.922 175.291,47.478 175.142,47.627 175.142,47.882 176.12,48.86 T_J2.8@176.27,48.86
  L4 w0.127: T_J2.8@176.27,48.86 176.12,48.86 175.142,47.882 175.142,47.627 175.217,47.553 175.494,47.553 175.666,47.724 177.532,47.724 177.609,47.802 177.629,47.802 177.856,48.028 T_R45.2@177.856,48.048
EEM_IO.LVDS_P11: IC16.6 T_J2.11 T_R46.2 | length 32.1
  L1 w0.127: IC16.6@166.978,43.495 166.978,43.22 167.101,43.097 167.101,42.724 167.412,42.414 167.624,42.414 167.815,42.414 ccw(c167.815,42.893) 168.294,42.893 168.294,43.289 cw(c168.519,43.289) 168.519,43.514 169.196,43.514 cw(c169.196,43.289) 169.421,43.289 169.421,39.397 ccw(c169.9,39.397) 169.9,38.918 170.577,38.918 ccw(c170.577,39.397) 171.056,39.397 171.056,42.188 cw(c171.281,42.188) 171.281,42.414 171.897,42.414 176.959,42.414 177.034,42.488 177.713,43.167 177.713,44.482 177.055,45.14 175.38,45.14 174.873,44.633 174.873,43.854 174.798,43.78 T_J2.11@173.73,43.78
  L4 w0.127: T_J2.11@173.73,43.78 174.728,43.78 174.847,43.66 174.847,42.832 175.304,42.375 177.532,42.375 177.609,42.298 177.629,42.298 T_R46.2@177.856,42.071 T_R46.2@177.856,42.051
EEM_IO.LVDS_P12: IC17.6 T_J2.14 T_R47.2 | length 30.5
  L1 w0.127: IC17.6@161.477,38.995 161.477,38.72 161.6,38.597 161.6,38.224 162.481,37.343 162.777,37.343 162.968,37.343 ccw(c162.968,37.823) 163.447,37.823 163.447,38.64 cw(c163.673,38.64) 163.673,38.866 164.349,38.866 cw(c164.349,38.64) 164.574,38.64 164.574,36.775 ccw(c165.054,36.775) 165.054,36.295 165.73,36.295 ccw(c165.73,36.775) 166.209,36.775 166.209,38.64 cw(c166.435,38.64) 166.435,38.866 167.111,38.866 cw(c167.111,38.64) 167.336,38.64 167.336,37.823 ccw(c167.816,37.823) 167.816,37.343 168.432,37.343 174.229,37.343 175.133,38.247 175.133,39.134 175.291,39.292 175.291,39.858 175.142,40.007 175.142,40.262 176.12,41.24 T_J2.14@176.27,41.24
  L4 w0.127: T_J2.14@176.27,41.24 176.12,41.24 175.142,40.262 175.142,40.007 175.217,39.933 175.494,39.933 175.666,40.104 177.532,40.104 177.609,40.182 177.629,40.182 177.856,40.408 T_R47.2@177.856,40.428
EEM_IO.LVDS_P13: T_J2.17
EEM_IO.LVDS_P14: T_J2.20
EEM_IO.LVDS_P15: T_J2.23
GA0: T_R13.1 T_R31.1 T_T2.1 | length 5.6
  L1 w0.152: T_T2.1@180.1,9.55 180.958,9.55 181.993,8.515 183.523,8.515 184.032,9.024 T_R31.1@184.032,9.034 184.032,9.044 T_R13.1@185.002,9.044
GA1: T_R14.1 T_R32.1 T_T3.1 | length 11.7
  L1 w0.152: T_T3.1@174.216,9.55 178.3,9.55 179.1,10.35 181.004,10.35 181.785,9.569 182.714,9.569 182.718,9.565 183.467,9.565 183.471,9.569 183.523,9.569 T_R32.1@184.032,10.078 184.032,10.098 T_R14.1@185.002,10.098
GA2: T_R16.1 T_R33.1 T_T4.1 | length 6.4
  L1 w0.152: T_T4.1@180.1,13.017 180.291,13.017 180.529,12.778 180.529,12.342 182.247,10.623 183.523,10.623 184.032,11.133 T_R33.1@184.032,11.153 T_R16.1@185.002,11.153
GA3: T_R18.1 T_R34.1 T_T5.1 | length 14
  L1 w0.152: T_T5.1@174.216,13.027 174.401,13.027 174.65,13.276 174.65,13.462 174.665,13.477 174.665,14.065 175.5,14.9 178.225,14.9 179.425,13.7 180.815,13.7 181.481,13.034 181.481,12.375 182.179,11.678 183.523,11.678 184.032,12.187 T_R34.1@184.032,12.207 T_R18.1@185.002,12.207